# Altium PCB PCB1.PcbDoc
Units mil, origin at the board's own origin, x right, y up, seen from the top; angles counter-clockwise.
Board outline 3545 x 2310 mil, 2 copper layers (Top Layer, Bottom Layer); 12 components, 13 nets, 38 pads, 0 vias.
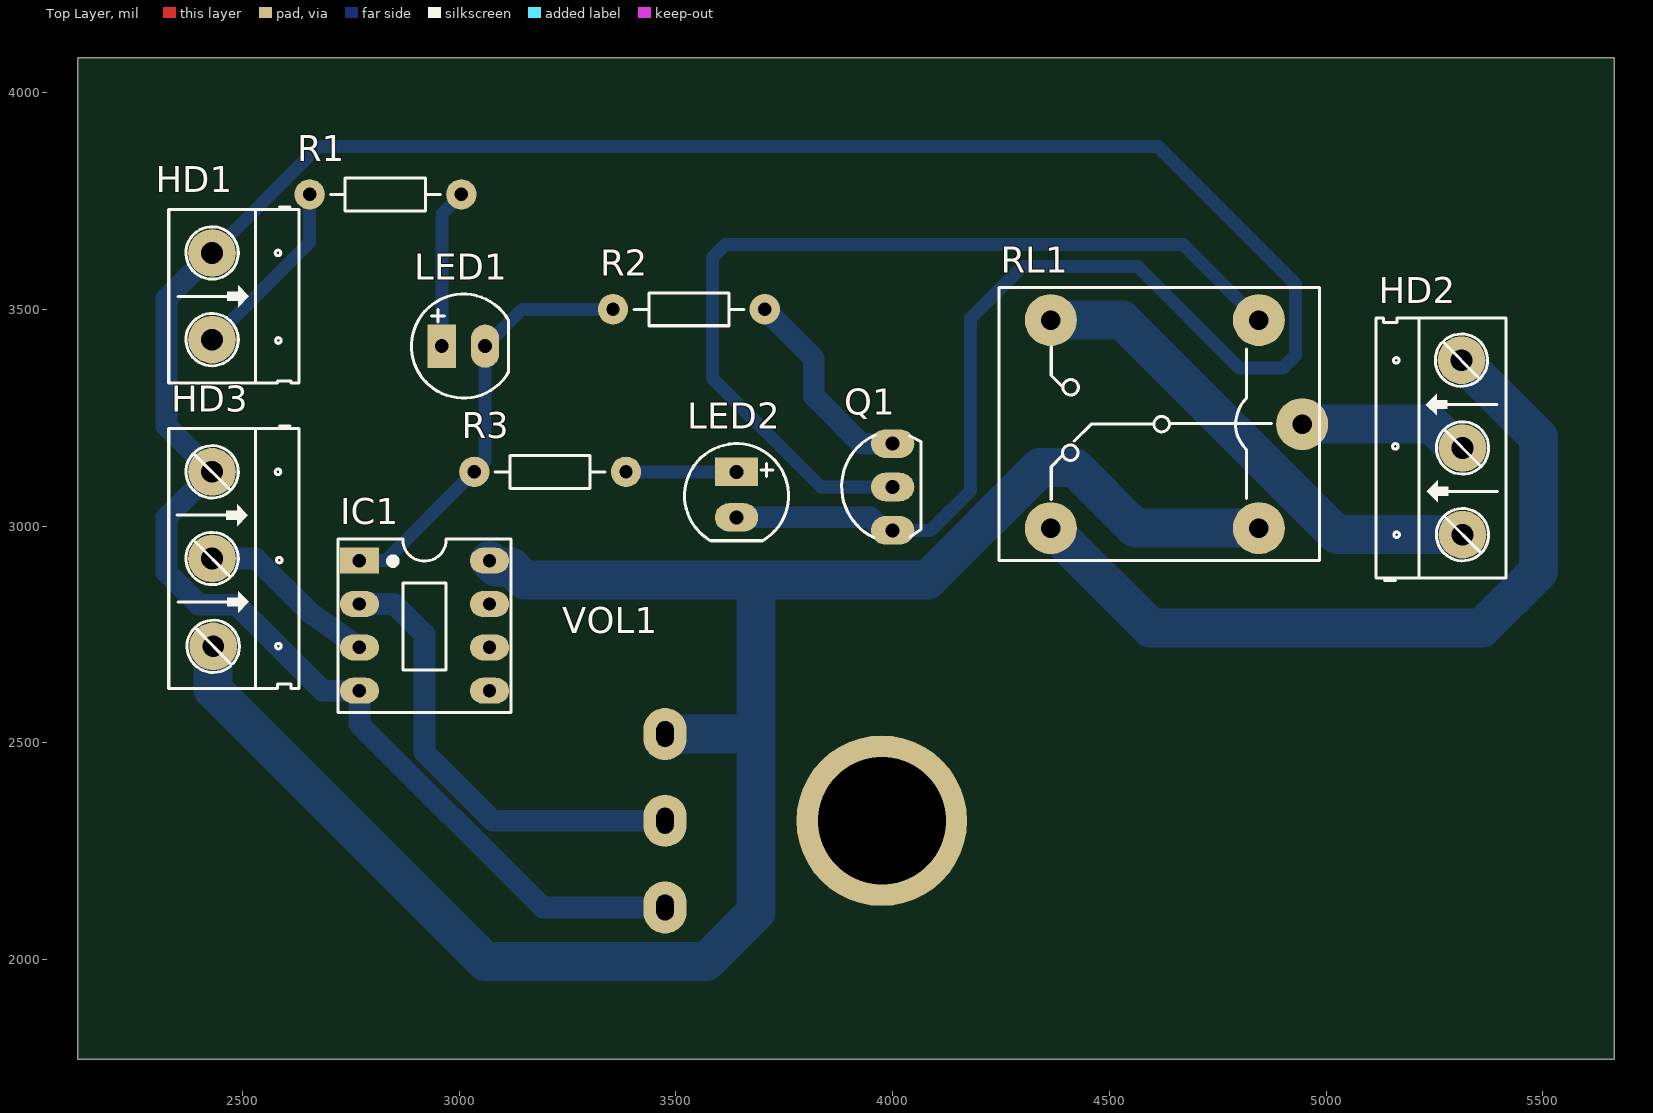
[diagram p0: Top Layer view]
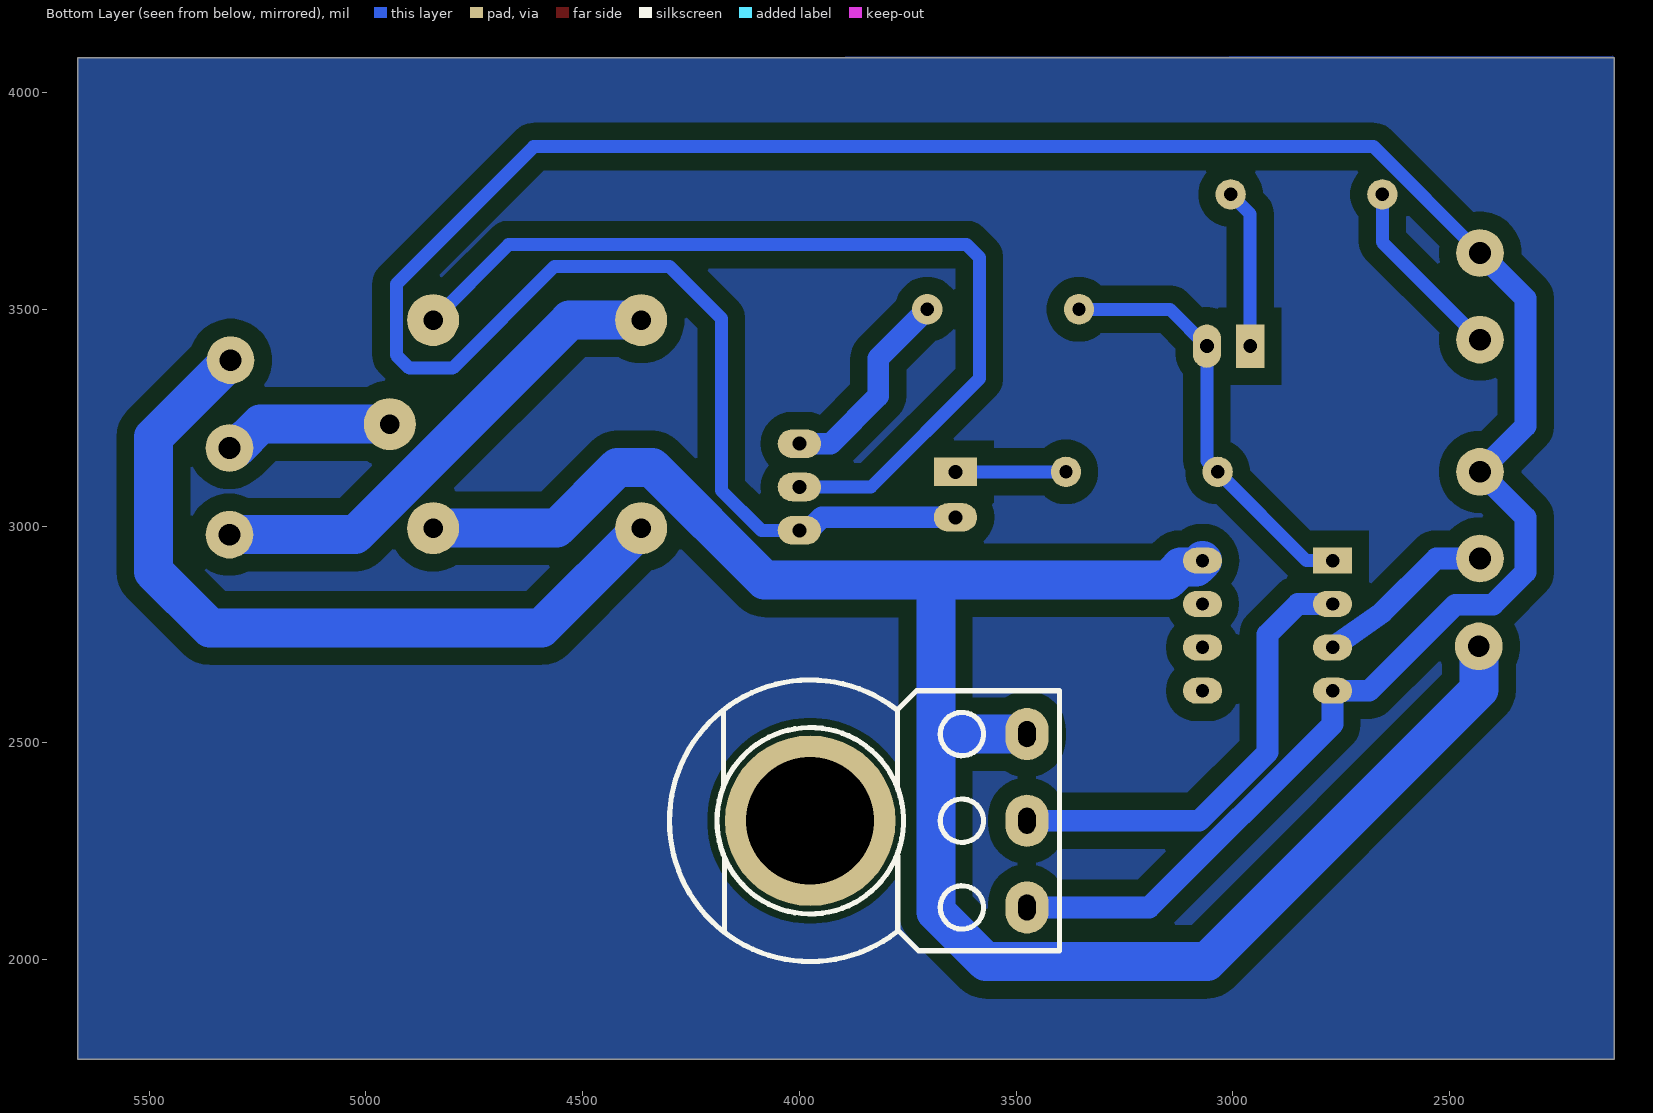
[diagram p1: Bottom Layer view, seen from below]
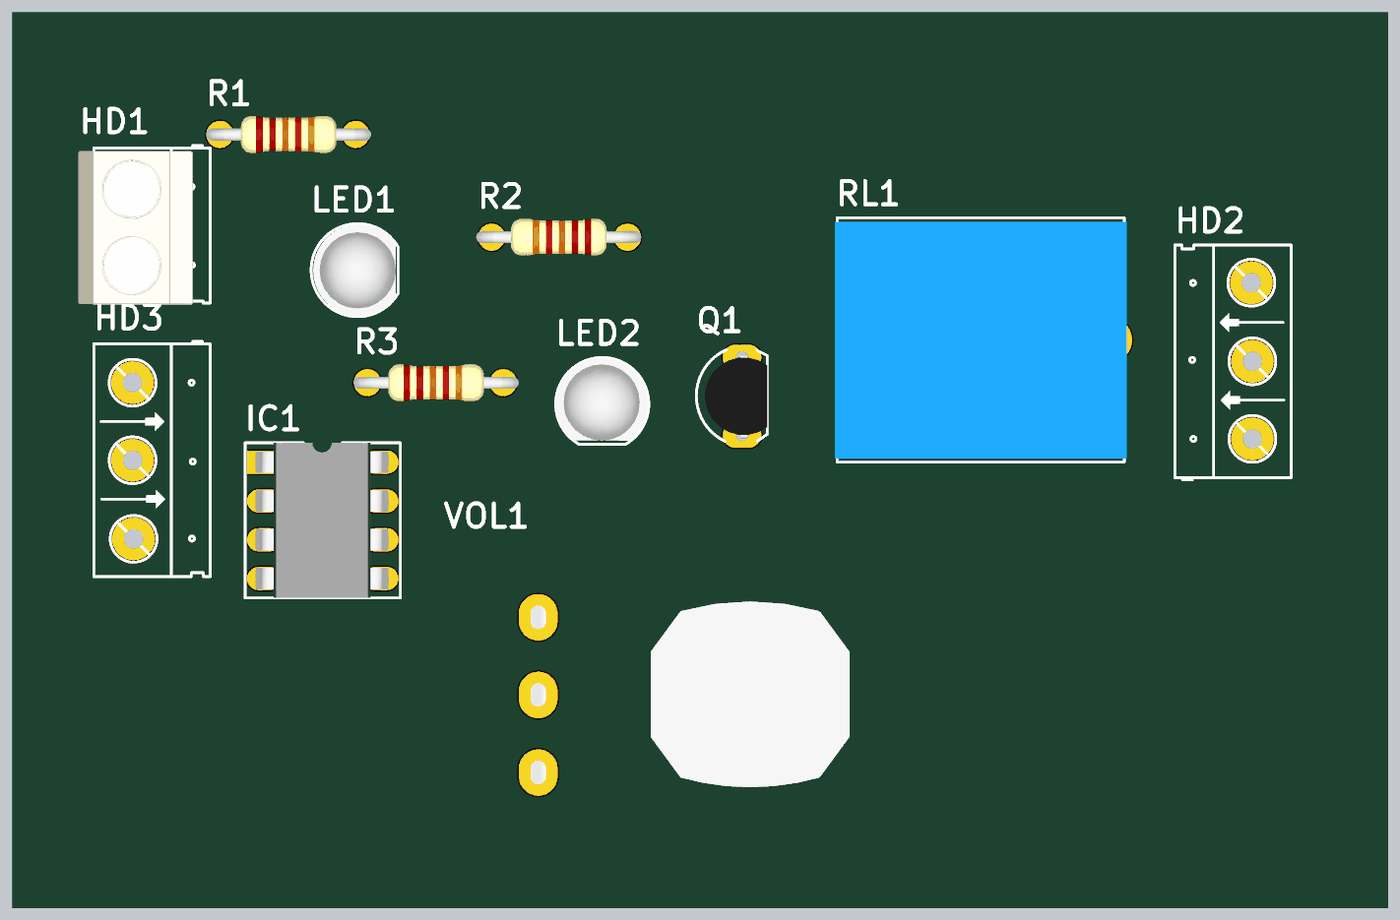
[diagram p2: 3D render of the assembled board from above, using the file's embedded part models]

## Layer stack, top to bottom
Top Solder: solder mask 0.4, Solder Resist, Dk 3.5
Top Layer: signal copper 1.4
Dielectric 1: dielectric 12.6, FR-4, Dk 4.8
Bottom Layer: signal copper 1.4
Bottom Solder: solder mask 0.4, Solder Resist, Dk 3.5

## Board outline
2120,1770 5665,1770 5665,4080 2120,4080

## Design rules (kind name [scope] priority, off if disabled: settings)
Clearance [All] p1: gap=10 ignorepadtopadclearanceinfootprint=FALSE except(0: Arc-Hole Track-Hole SMDPad-Hole THPad-Hole Via-Hole Fill-Hole Poly-Hole Region-Hole Text-Hole; 40: Arc-Fill Arc-Poly Arc-Region Track-Fill Track-Poly Track-Region SMDPad-Fill SMDPad-Poly SMDPad-Region THPad-Fill THPad-Poly THPad-Region Via-Fill Via-Poly Via-Region Fill-Fill Fill-Poly Fill-Region Poly-Poly Poly-Region Region-Region)
PolygonConnect [All] p1: connectstyle=Relief reliefconductorwidth=10 reliefentries=4 polygonreliefangle="90 Angle" airgapwidth=10
RoutingLayers [All] p1: top layer_v5=FALSE bottom layer_v5=TRUE
RoutingVias [All] p1: holewidth=28 width=50 viastyle="Through Hole" minholewidth=28 minwidth=50 maxholewidth=28 maxwidth=50
SolderMaskExpansion [All] p1: expansion=4 istentingtop=FALSE
Width [All] p1: maxlimit=150 minlimit=28 preferedwidth=50 toplayer_prefwidth=30 bottomlayer_minwidth=40 minimp=50.000000 maximp=50.000000 favimp=50.000000
29 further rules are at their usual default settings.

## Classes and differential pairs
component class Sheet1: HD3 IC1 LED1 LED2 Q1 R1 R2 R3 RL1 VOL1

## Components (designator, comment, footprint, x,y, rotation, side; value= is the part's Value field where it differs from the comment)
HD1 "Header 2" HED2 2430,3630 r270 top
HD2 "Header 3" HED3 5315,2980 r90 top
HD3 "Header 3" HED3 2430,3125 r270 top
IC1 "LM358" DIP8/W0.3 2770,2920 r270 top
LED1 "LED" LED-5-RED 2960,3415 r0 top value="LED 3 ly Single Colour"
LED2 "LED" LED-5-Green 3640,3120 r270 top value="LED 3 ly Single Colour"
Q1 "C2383" QTO-92 4000,3090 r90 top value=C1815
R1 "1k" R1/4W 3005,3765 r180 top value="R1/4W - 1K"
R2 "1k" R1/4W 3355,3500 r0 top value="R1/4W - 1K"
R3 "1k" R1/4W 3385,3125 r180 top value="R1/4W - 1K"
RL1 "Relay 10A/12V" RL_SPDT_10A 4945,3235 r180 top value="Relay SPDT, 10A, 12V"
VOL1 "50K" VOL_SMD 3475,2520 r270 top value="Volume 50k"

## Footprints (in the part's own frame and the unit in brackets; to place one, negate y for a bottom-side part, rotate by r counter-clockwise, add the part's x,y. Pads: shape width x height; smd on the part's side, far side on the other; paste and mask are expansions set on the pad)
DIP8/W0.3 [mil] "8 PIN, W 300mil, Pin to pin 100mil"
  rect 60x90 hole 31: 1(0,0)
  oval 60x90 hole 31: 2(100,0) 3(200,0) 4(300,0) 5(300,300) 6(200,300) 7(100,300) 8(0,300)
  silkscreen extent -50,-50 350,350, body extent -50,-40 350,336, height 201
HED2 [mil] "Header 2, 2 pin, hight 300mil, Pin to Pin 200, Colour Green"
  round 110 hole 50: 1(0,0) 2(200,0)
  silkscreen extent -106,-100 300,200, body extent -92,-140 302,155, height 394
HED3 [mil] "Header 3, 3 pin, hight 300mil, Pin to Pin 200, Colour Green"
  round 110 hole 50: 1(0,0) 2(200,0) 3(402.62,2.62)
  silkscreen extent -106,-100 500,200
LED-5-Green [mil] "LED 2 PIN, 5 ly , Only colour,pin to pin 100mil"
  rect 65x100 hole 32: 1(-5,0)
  oval 65x100 hole 32: 2(100,0)
  silkscreen extent -70,-120 154,120, body extent -69,-120 145,117, height 339
LED-5-RED [mil] "LED 2 PIN, 5 ly , Only colour,pin to pin 100mil"
  rect 65x100 hole 32: 1(0,0)
  oval 65x100 hole 32: 2(100,0)
  silkscreen extent -70,-120 154,120, body extent -65,-119 149,118, height 339
QTO-92 [mil] "TO-92"
  oval 66x100 hole 32: 1(-100,0) 2(0,0) 3(100,0)
  silkscreen extent -117,-65 120,118, body extent -109,-66 109,95, height 245
R1/4W [mil] "R 1/4W, 2 Pin, 350mil"
  round 70 hole 31: 1(0,0) 2(350,0)
  silkscreen extent 48,-38 302,38, body extent -40,-47 386,47, height 111
RL_SPDT_10A [mil] "Relay SPDT, 5 pin, 10A,W 650mil, L 800mil, H 800mil"
  round 120 hole 45: 1(0,0) 2(580,240) 3(580,-240) 4(100,-240) 5(100,240)
  silkscreen extent -40,-315 700,315, body extent -46,-304 706,306, height 602
VOL_SMD [mil]
  round 393.7 hole 295.28: 0(200,500)
  oval 120x100 hole 40 slot 60 at 0 deg: 1(0,0) 2(200,0) 3(400,0)
  body extent -203,-247 600,947, height 866

## Part data
HD1: library part Hed2, "Header 2 (Green)"
HD2 HD3: library part Hed3, "Header 3 (Green)"
IC1: "Low-Power Dual Operational Amplifier"
LED1 LED2: "LED Single colour Green and Red"
Q1: library part NPN_ECB, "P 600mW, ECB"
R1 R2 R3: library part R1/4W, "Resistor 1/4W"
RL1: library part "Relay 1", "Relay SPDT,10A - 12VDC 5 Pin"
VOL1: library part VOL-S, "Var Resistor"

## Nets (pads, with @x,y where several pads share a name; then routed paths per layer and width w, separated by ;. In a path a pad name is that pad's centre, name@x,y a point inside that pad or via, vN(x,y) a via of type N, cw(c..) or ccw(c..) an arc to the next point about the centre after c; other vN are vias at no path point)
GND: HD1.1 HD3.1 IC1.4 LED2.2 Q1.1 VOL1.3 | length 7176.8
  Bottom Layer w30: HD1.1 2675,3875 4613,3875 4930,3558 4930,3394 4900,3364 4800,3364 4565,3599 4300,3599 4180,3479 4180,3082 4088,2990 Q1.1
  Bottom Layer w50: HD1.1 2325,3525 2325,3230 HD3.1 2325,3020 2325,2893 2400,2818 2487,2818 2685,2620 IC1.4 2770,2542.57 3192.57,2120 VOL1.3 ; LED2.2 3948.67,3020 3978.67,2990 Q1.1
NetHD1_2: HD1.2 R1.2 | length 428.2
  Bottom Layer w30: HD1.2 2655,3655 R1.2
NetHD2_1: HD2.1 RL1.3 | length 1155
  Bottom Layer w90: RL1.3 4530,3475 5025,2980 HD2.1
NetHD2_2: HD2.2 RL1.1 | length 392.8
  Bottom Layer w50: HD2.2@5298.76,3180 HD2.2
  Bottom Layer w90: RL1.1 5243.76,3235 HD2.2@5298.76,3180
NetHD2_3: HD2.3 RL1.2 | length 1835.3
  Bottom Layer w90: RL1.2 4595,2765 5360,2765 5490,2895 5490,3205 HD2.3
NetHD3_2: HD3.2 IC1.3 | length 417
  Bottom Layer w50: HD3.2 2531,2925 2656,2800 IC1.3
NetIC1_1: IC1.1 LED1.2 R2.1 R3.2 | length 980.5
  Bottom Layer w30: IC1.1 2830,2920 R3.2 3060,3150 LED1.2 3145,3500 R2.1
NetIC1_2: IC1.2 VOL1.2 | length 1071.4
  Bottom Layer w50: IC1.2 2850,2820 2920,2750 2920,2478 3078,2320 VOL1.2
NetLED1_1: LED1.1 R1.1 | length 368.6
  Bottom Layer w30: LED1.1 2960,3720 R1.1
NetLED2_1: LED2.1 R3.1 | length 255
  Bottom Layer w30: R3.1 LED2.1
NetQ1_2: Q1.2 RL1.4 | length 2142.6
  Bottom Layer w30: Q1.2 3835,3090 3585,3340 3585,3620 3614,3649 4671,3649 RL1.4
NetQ1_3: Q1.3 R2.2 | length 474.4
  Bottom Layer w50: R2.2 3818,3387 3818,3300 3928,3190 Q1.3
VCC: HD3.3 IC1.8 RL1.5 VOL1.1 | length 4573.4
  Bottom Layer w50: 3675,2520 3685,2510
  Bottom Layer w90: HD3.3 2432.62,2622.38 3060,1995 3570,1995 3685,2110 3685,2510 3685,2850 ; IC1.8 3085,2905 3120.21,2905 3150.21,2875 4080,2875 4340,3135 4420,3135 4560,2995 RL1.5 ; VOL1.1 3675,2520
pads on no net: IC1.5 IC1.6 IC1.7 VOL1.0

## Polygon pours and split planes (outlines as drawn)
no net on Bottom Layer "NONET_L02_P000" (solid, pour order 0): 2115,4090 2120,4085 5665,4080 5665,1770 2120,1770 2120,4085